# Altium PCB John_Main.PcbDoc (part 1 of 4)
Units mil, origin at the board's own origin, x right, y up, seen from the top; angles counter-clockwise.
Board outline 3346 x 2756 mil, 2 copper layers (Top Layer, Bottom Layer), stack 57 mil thick; 275 components, 161 nets, 721 pads, 395 vias.
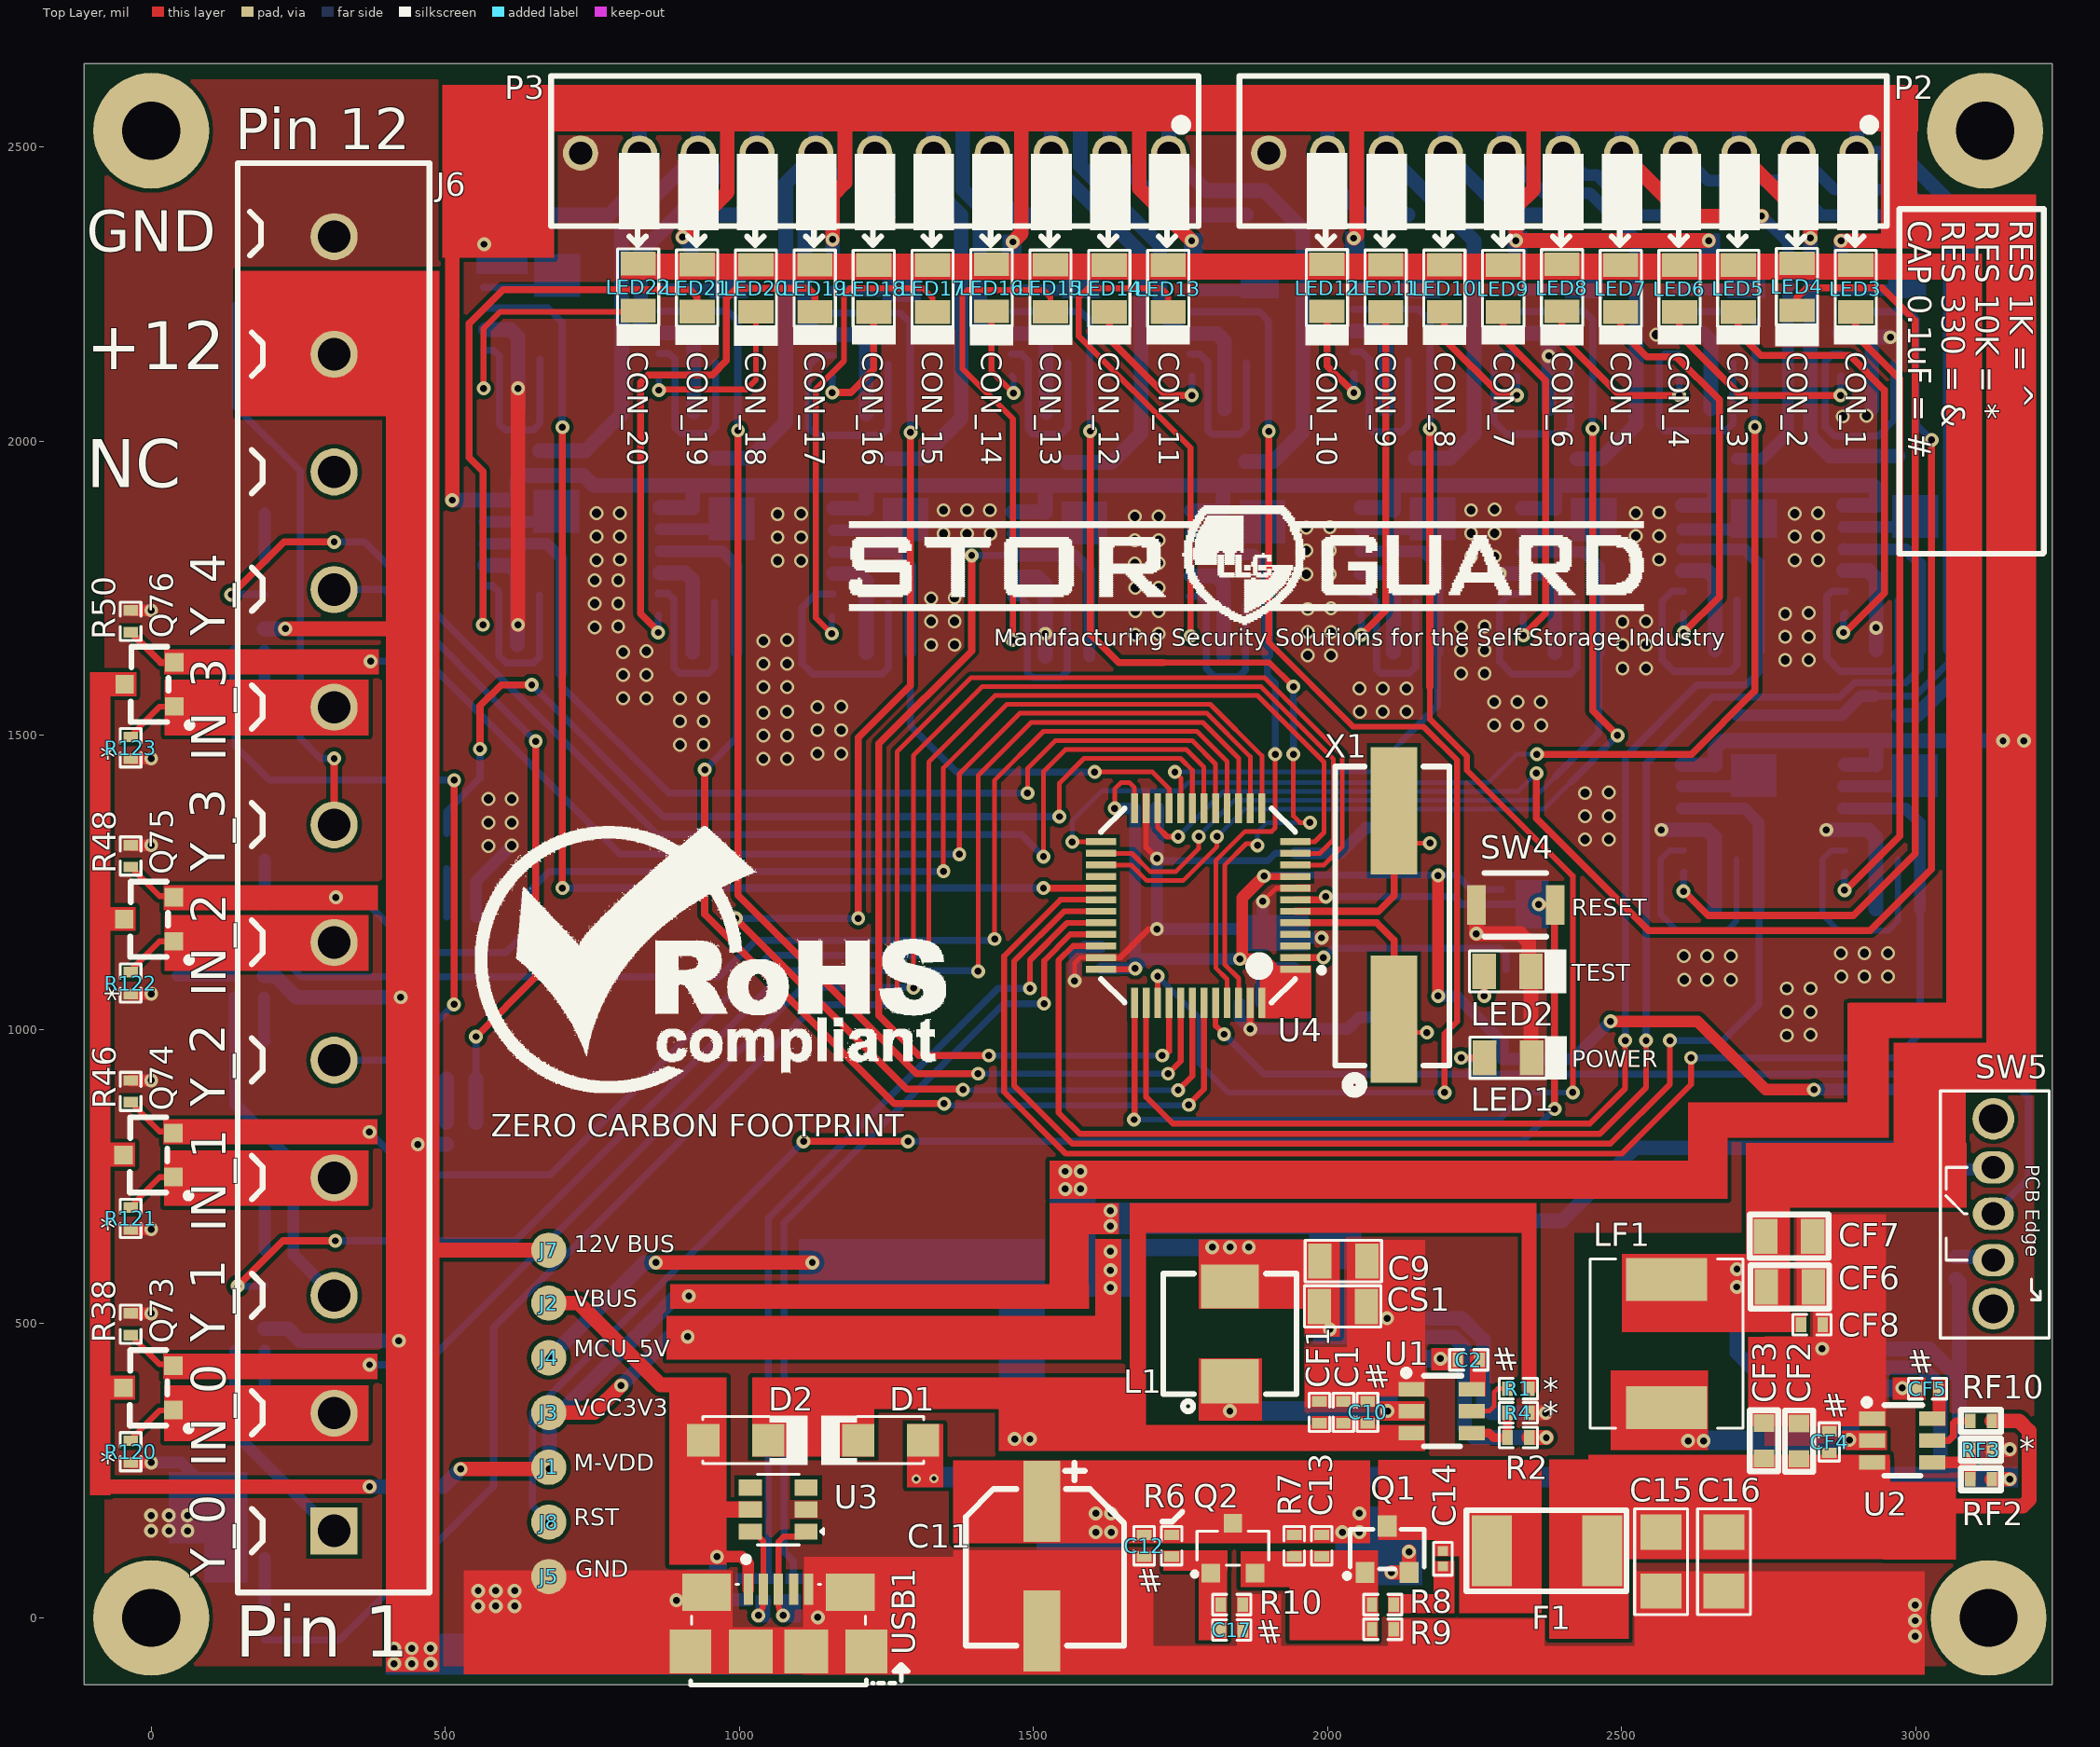
[diagram p0: Top Layer view]
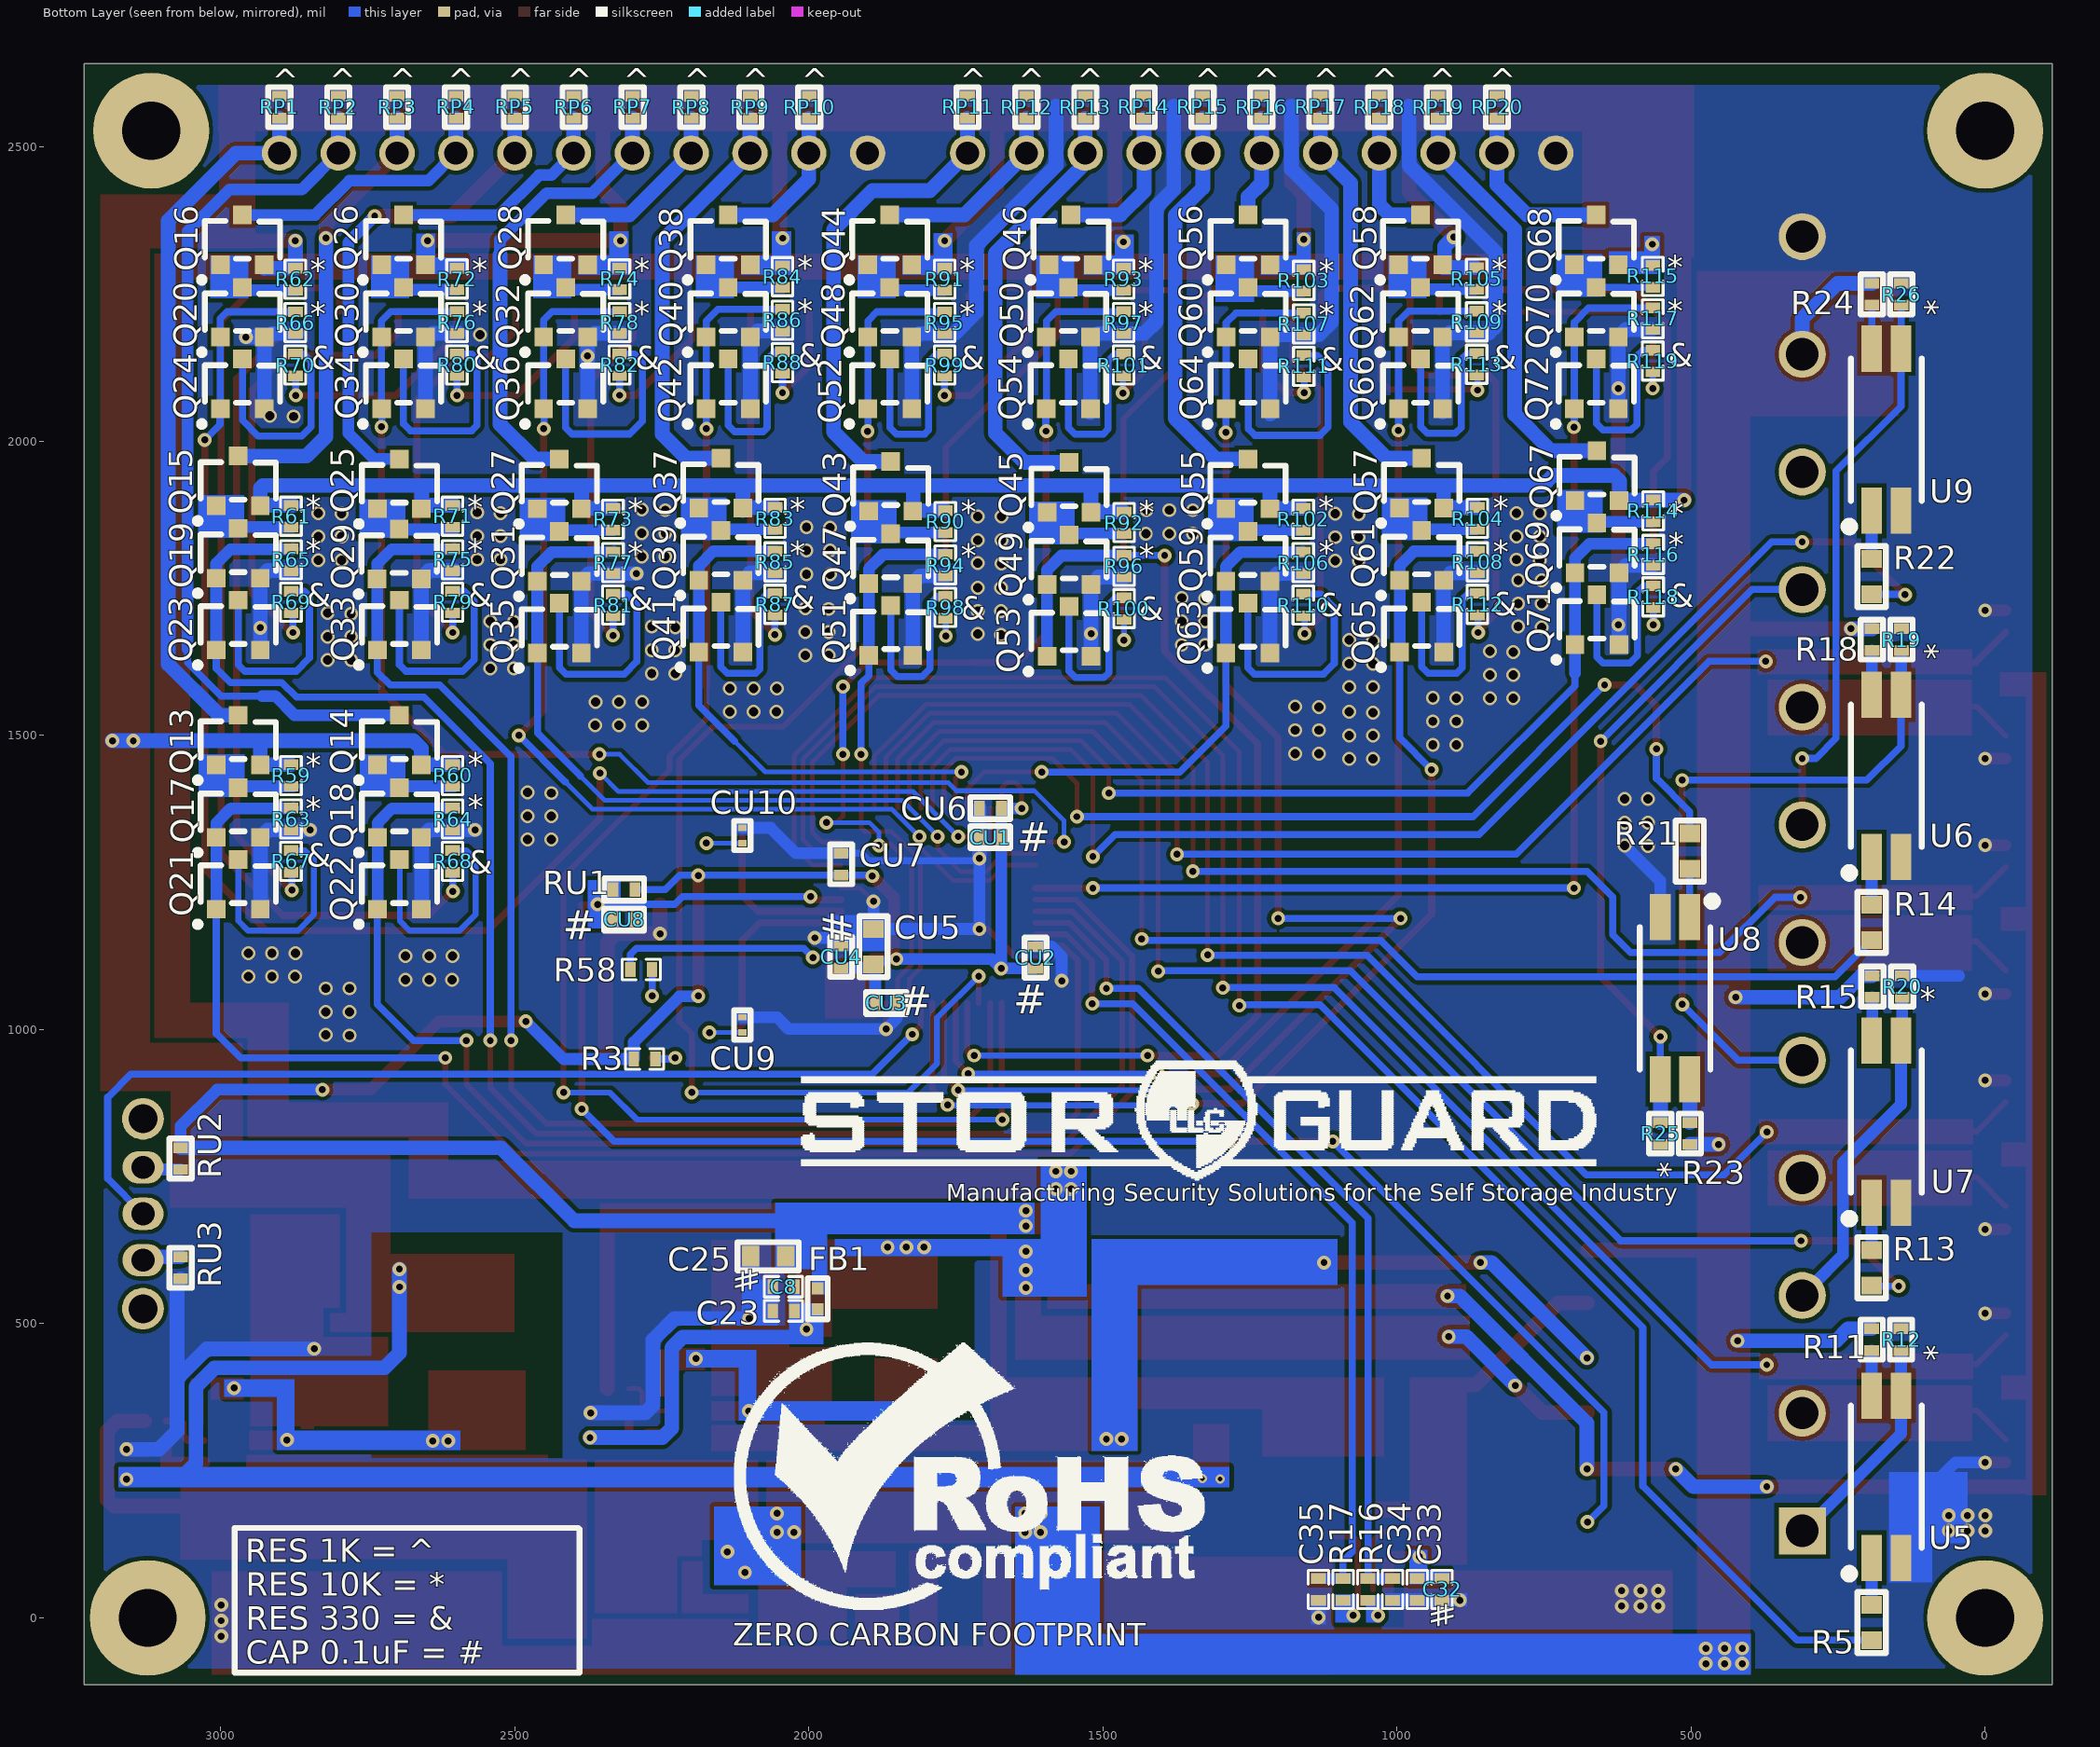
[diagram p1: Bottom Layer view, seen from below]
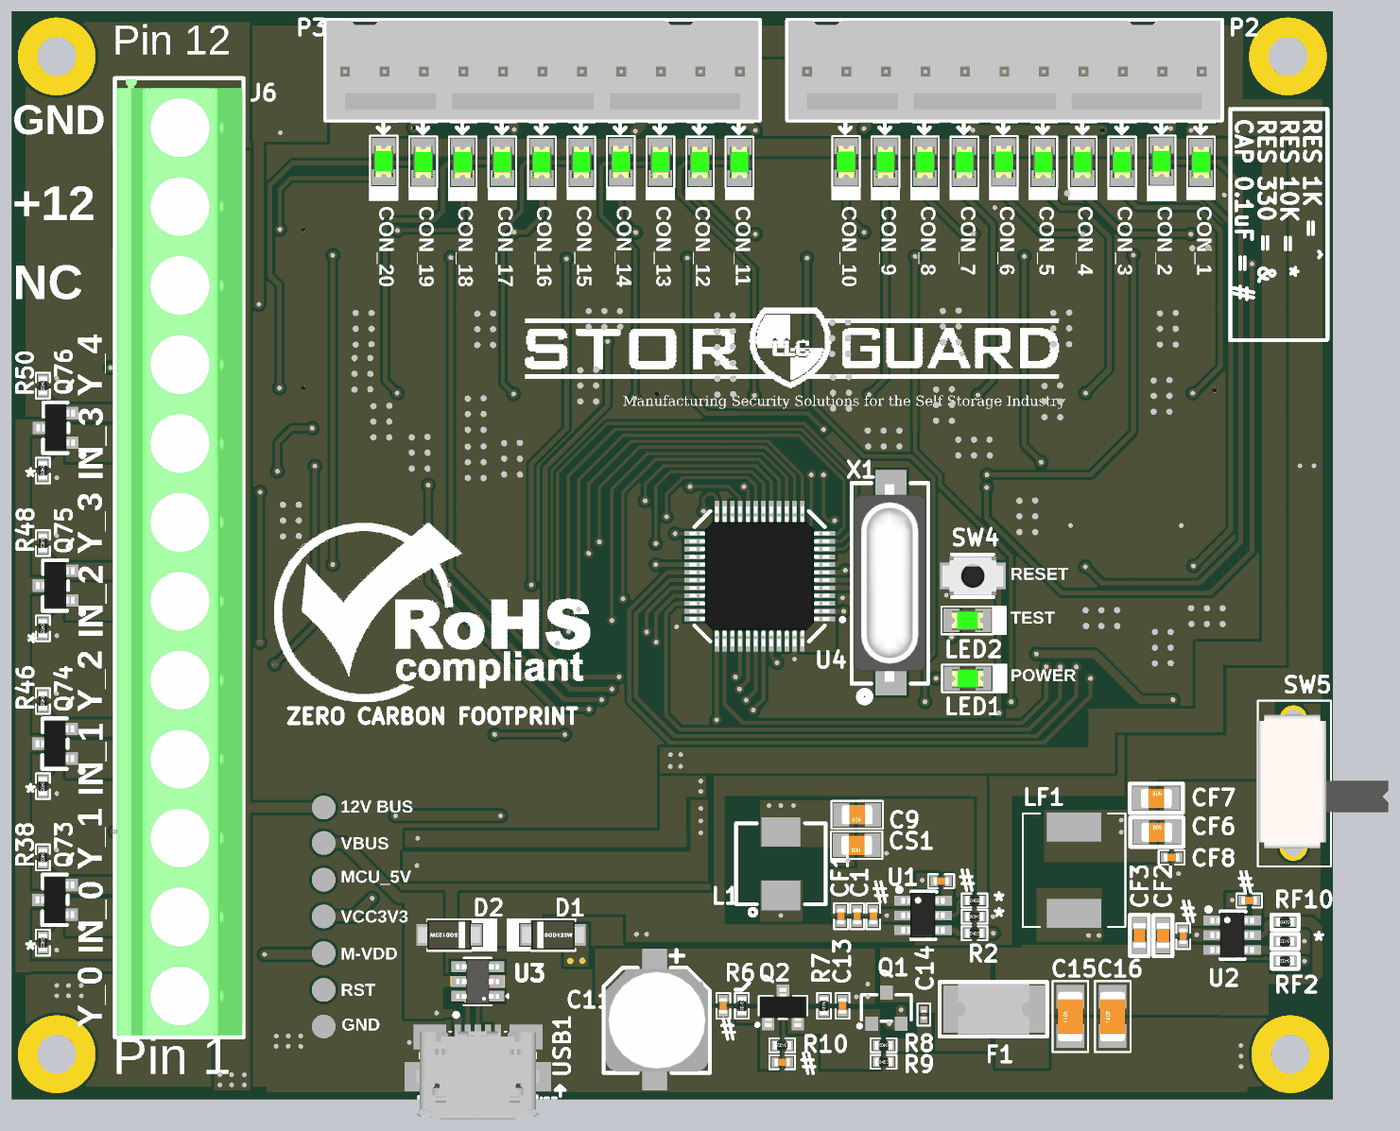
[diagram p4: 3D render of the assembled board from above, using the file's embedded part models]
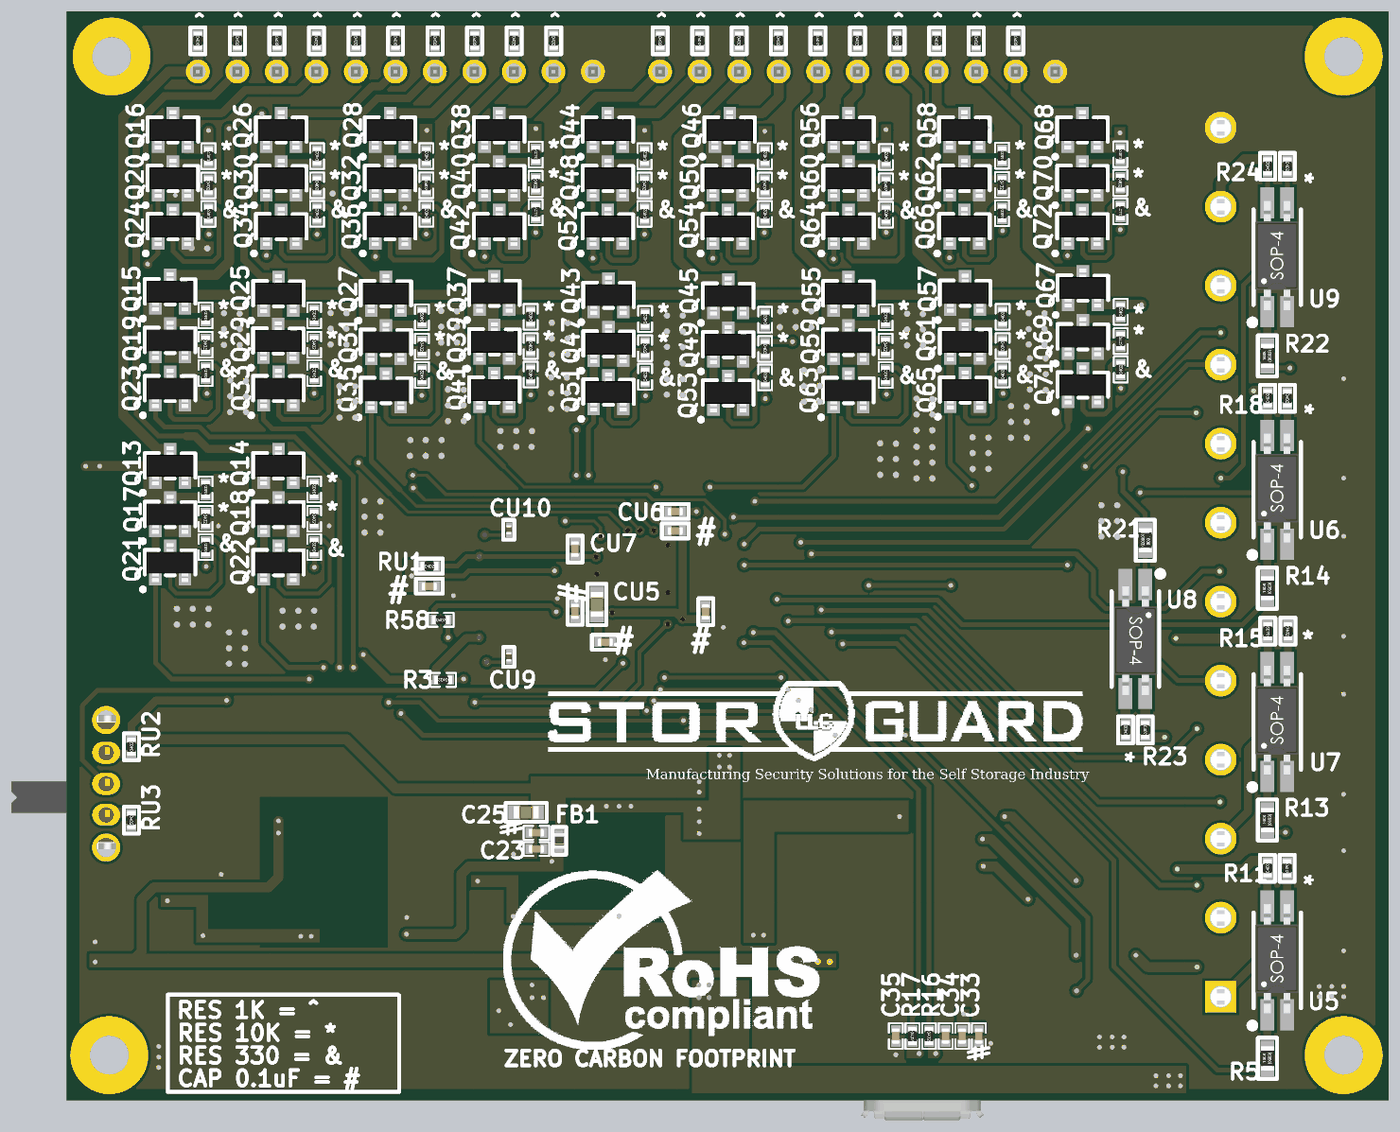
[diagram p5: 3D render of the assembled board from below, using the file's embedded part models]

## Layer stack, top to bottom
Top Solder: solder mask 2.9921, Solder Resist, Dk 3.5
Top Layer: signal copper 10
Dielectric 1: dielectric 37, FR-4, Dk 4.8
Bottom Layer: signal copper 10
Bottom Solder: solder mask 3, Solder Resist, Dk 3.5

## Board outline
-114,-114 -114,2642 3232,2642 3232,-114

## Design rules (kind name [scope] priority, off if disabled: settings)
Clearance [All] p1: gap=7 ignorepadtopadclearanceinfootprint=FALSE except(4: Arc-SMDPad Track-SMDPad SMDPad-SMDPad)
HoleToHoleClearance [All] p1: gap=2 allowstackedmicrovias=TRUE
MinimumSolderMaskSliver [All] p1: minsoldermaskwidth=0
PolygonConnect [All] p1: connectstyle=Direct reliefconductorwidth=10 reliefentries=4 polygonreliefangle="90 Angle" airgapwidth=10
RoutingVias [All] p1: holewidth=11.81 width=23.62 viastyle="Through Hole" minholewidth=7.87 minwidth=15.75 maxholewidth=15.75 maxwidth=23.62
SilkToSilkClearance [All] p1: silktosilkclearance=0
SilkToSolderMaskClearance [IsPad] p1: minsilkscreentomaskgap=0 clearancetoexposedcopper=TRUE
SolderMaskExpansion SolderMaskExpansion_1 [IsVia] p1: expansion=4 istentingtop=FALSE soldermaskfromhole=TRUE
SolderMaskExpansion [Not IsVia] p2: expansion=4 istentingtop=FALSE
Width [All] p1: maxlimit=25 minlimit=8 preferedwidth=12 minimp=50.000000 maximp=50.000000 favimp=50.000000
26 further rules are at their usual default settings.

## Classes and differential pairs
component class Controller_Section: LED3 LED4 LED5 LED6 LED7 LED8 LED9 LED10 LED11 LED12 P2 Q13 Q14 Q15 Q16 Q17 Q18 Q19 Q20 Q21 Q22 Q23 Q24 Q25 Q26 Q27 Q28 Q29 Q30 Q31 Q32 Q33 Q34 Q35 Q36 Q37 Q38 Q39 Q40 Q41 Q42 R59 R60 R61 R62 R63 R64 R65 R66 R67 R68 R69 R70 R71 R72 R73 R74 R75 R76 R77 R78 R79 R80 R81 R82 R83 R84 R85 R86 R87 R88 RP1 RP2 RP3 RP4 RP5 RP6 RP7 RP8 RP9 RP10
component class USB_Section: C32 C33 C34 C35 D1 D2 R16 R17 U3 USB1
component class "Top Sheet": J1 J2 J3 J4 J5 J7
component class Power_Section: C1 C2 C8 C9 C10 C11 C12 C13 C14 C15 C16 C17 C23 C25 CF1 CF2 CF3 CF4 CF5 CF6 CF7 CF8 CS1 F1 FB1 L1 LED1 LF1 Q1 Q2 R1 R2 R3 R4 R6 R7 R8 R9 R10 RF2 RF3 RF10 U1 U2
component class "U_Connector Section": J6 Q73 Q74 Q75 Q76 R5 R11 R12 R13 R14 R15 R18 R19 R20 R21 R22 R23 R24 R25 R26 R38 R46 R48 R50 R120 R121 R122 R123 U5 U6 U7 U8 U9
component class Controller_Section: CU1 CU2 CU3 CU4 CU5 CU6 CU7 CU8 CU9 CU10 J8 LED2 R58 RU1 RU2 RU3 SW4 SW5 U4 X1

## Components (designator, comment, footprint, x,y, rotation, side; value= is the part's Value field where it differs from the comment)
C1 "10uF" Cap0402 2026.94,349.5 r90 top
C2 "0.1uF" Cap0402 2239.94,438.5 r180 top
C8 "0.1uF" Cap0402 2042.94,562.88 r0 bottom
C9 "22uF" Cap0805 2026.94,606.5 r180 top
C10 "0.1uF" Cap0402 2067.94,349.5 r90 top
C11 "180uF" 16SVPF180M 1514.1,87.8 r270 top
C12 "0.1uF" Cap0402 1688.1,122.5 r90 top
C13 "470nF" Cap0402 1990.1,122.5 r90 top
C14 "47nF" "Cap 0201"#1 2196.1,100.5 r90 top
C15 "47uF" Cap1206 2567.1,95.5 r90 top
C16 "47uF" Cap1206 2674.1,95.5 r90 top
C17 "0.1uF" Cap0402 1837.1,-20.5 r180 top
C23 "10uF" Cap0402 2042.94,521.88 r0 bottom
C25 "4.7UF" Cap0603 2068.94,614.5 r0 bottom
C32 "0.1uF" Cap0402 923.36,48.32 r270 bottom
C33 "10uF" Cap0402 965.36,48.32 r270 bottom
C34 "47pF" Cap0402 1007.36,48.32 r270 bottom
C35 "47pF" Cap0402 1133.36,48.32 r270 bottom
CF1 "10uF" Cap0402 1985.94,349.5 r90 top
CF2 "10uF" Cap0603 2801.62,300.5 r270 top
CF3 "10uF" Cap0603 2741.94,301 r270 top
CF4 "0.1uF" Cap0402 2852.94,299 r90 top
CF5 "0.1uF" Cap0402 3019.94,389.5 r180 top
CF6 "22uF" Cap0805 2785.88,562.5 r0 top
CF7 "22uF" Cap0805 2784.94,648.5 r0 top
CF8 "0.1uF" Cap0402 2823.38,498.5 r0 top
CS1 "22uF" Cap0805 2025.94,529.5 r180 top
CU1 "0.1uF" Cap0402 1691.42,1327 r0 bottom
CU2 "0.1uF" Cap0402 1614.65,1122.42 r90 bottom
CU3 "0.1uF" Cap0402 1868.58,1045.65 r180 bottom
CU4 "0.1uF" Cap0402 1945.35,1123.6 r90 bottom
CU5 "4.7UF" Cap0603 1890,1141 r270 bottom
CU6 "1uF" Cap0402 1691.42,1376.35 r0 bottom
CU7 "10nF" Cap0402 1945.35,1281.08 r90 bottom
CU8 "0.1uF" Cap0402 2314,1187 r0 bottom
CU9 "20pF" "Cap 0201"#2 2113,1007.99 r270 bottom
CU10 "20pF" "Cap 0201"#2 2113,1330 r270 bottom
D1 "PMEG3010ER,115" SOD123W 1257.12,302 r180 top
D2 "PMEG3010ER,115" SOD123W 993.88,302 r0 top
F1 "MF-MSMF250/16X-2" MF-MSMF250/16X-2 2373.1,114 r0 top
FB1 "MMZ1005F121ET000" MMZ1005F121ET000 1984.94,542.38 r90 bottom
J1 "Socket" Socket 676,255.94 r0 top
J2 "Socket" Socket 676,535.14 r90 top
J3 "Socket" Socket 676,349 r90 top
J4 "Socket" Socket 676,442.07 r90 top
J5 "Socket" Socket 675.97,70.18 r90 top
J6 "1729225" "Terminal Block 12 Pin" 311,148 r90 top locked
J7 "Socket" Socket 676,625 r0 top
J8 "Socket" Socket 676,162.87 r0 top
L1 "MS0530-2R2M" MS0530-2R2M 1833.94,482.65 r90 top locked value=2.2uH
LED1 "LTST-C190KGKT" "LED SMT" 2307,952 r0 top
LED2 "LTST-C190KGKT" "LED SMT" 2306,1099 r0 top
LED3 "LTST-C190KGKT" "LED SMT" 2898,2259.69 r270 top
LED4 "LTST-C190KGKT" "LED SMT" 2798.11,2262.65 r270 top
LED5 "LTST-C190KGKT" "LED SMT" 2698.22,2259.65 r270 top
LED6 "LTST-C190KGKT" "LED SMT" 2598.33,2259.65 r270 top
LED7 "LTST-C190KGKT" "LED SMT" 2498.44,2259.69 r270 top
LED8 "LTST-C190KGKT" "LED SMT" 2398.56,2261 r270 top
LED9 "LTST-C190KGKT" "LED SMT" 2298.67,2259.65 r270 top
LED10 "LTST-C190KGKT" "LED SMT" 2198.78,2260.15 r270 top
LED11 "LTST-C190KGKT" "LED SMT" 2098.89,2260.15 r270 top
LED12 "LTST-C190KGKT" "LED SMT" 1999,2261 r270 top
LED13 "LTST-C190KGKT" "LED SMT" 1729,2259.65 r270 top
LED14 "LTST-C190KGKT" "LED SMT" 1628.89,2259.65 r270 top
LED15 "LTST-C190KGKT" "LED SMT" 1528.78,2260.15 r270 top
LED16 "LTST-C190KGKT" "LED SMT" 1428.67,2261 r270 top
LED17 "LTST-C190KGKT" "LED SMT" 1328.56,2259.65 r270 top
LED18 "LTST-C190KGKT" "LED SMT" 1228.44,2259.65 r270 top
LED19 "LTST-C190KGKT" "LED SMT" 1128.33,2260.15 r270 top
LED20 "LTST-C190KGKT" "LED SMT" 1028.22,2260 r270 top
LED21 "LTST-C190KGKT" "LED SMT" 928.11,2260.65 r270 top
LED22 "LTST-C190KGKT" "LED SMT" 828,2262.15 r270 top
LF1 "3.3uH" MCS0630-3R3MN2 2576.5,466.25 r90 top
P2 "0022232111" 0022232111 2400,2490 r180 top locked
P3 "0022232111" 0022232111 1230,2490 r180 top locked
Q1 "QM3001K" SOT-23 2101.1,116.5 r0 top value="P-Channel 30V Fast Switching MOSFET"
Q2 "BSS138LT1G" SOT23-3 1839.1,118.5 r0 top
Q13 "PMV65XP,215" SOT23-3 2969.99,1492 r180 bottom
Q14 "PMV65XP,215" SOT23-3 2695.99,1492 r180 bottom
Q15 "PMV65XP,215" SOT23-3 2969.99,1932.68 r180 bottom
Q16 "PMV65XP,215" SOT23-3 2962.99,2342.5 r180 bottom
Q17 "BSS138LT1G" SOT23-3 2969.99,1369 r180 bottom
Q18 "BSS138LT1G" SOT23-3 2695.99,1369 r180 bottom
Q19 "BSS138LT1G" SOT23-3 2969.99,1809.68 r180 bottom
Q20 "BSS138LT1G" SOT23-3 2962.99,2219.5 r180 bottom
Q21 "BSS138LT1G" SOT23-3 2969.99,1247 r180 bottom
Q22 "BSS138LT1G" SOT23-3 2695.99,1247 r180 bottom
Q23 "BSS138LT1G" SOT23-3 2969.99,1687.68 r180 bottom
Q24 "BSS138LT1G" SOT23-3 2962.99,2097.5 r180 bottom
Q25 "PMV65XP,215" SOT23-3 2695.99,1927.68 r180 bottom
Q26 "PMV65XP,215" SOT23-3 2689,2342.5 r180 bottom
Q27 "PMV65XP,215" SOT23-3 2423.99,1927.68 r180 bottom
Q28 "PMV65XP,215" SOT23-3 2413.36,2342.5 r180 bottom
Q29 "BSS138LT1G" SOT23-3 2696.4,1808.32 r180 bottom
Q30 "BSS138LT1G" SOT23-3 2689,2219.5 r180 bottom
Q31 "BSS138LT1G" SOT23-3 2423.99,1804.68 r180 bottom
Q32 "BSS138LT1G" SOT23-3 2413.36,2219.5 r180 bottom
Q33 "BSS138LT1G" SOT23-3 2695.99,1687.68 r180 bottom
Q34 "BSS138LT1G" SOT23-3 2689,2097.5 r180 bottom
Q35 "BSS138LT1G" SOT23-3 2423.99,1682.68 r180 bottom
Q36 "BSS138LT1G" SOT23-3 2413.36,2097.5 r180 bottom
Q37 "PMV65XP,215" SOT23-3 2149.45,1929 r180 bottom
Q38 "PMV65XP,215" SOT23-3 2137,2342.5 r180 bottom
Q39 "BSS138LT1G" SOT23-3 2149.45,1806 r180 bottom
Q40 "BSS138LT1G" SOT23-3 2137,2219.5 r180 bottom
Q41 "BSS138LT1G" SOT23-3 2149.45,1684 r180 bottom
Q42 "BSS138LT1G" SOT23-3 2137,2097.5 r180 bottom
Q43 "PMV65XP,215" SOT23-3 1860.61,1923.67 r180 bottom
Q44 "PMV65XP,215" SOT23-3 1862.19,2342.5 r180 bottom
Q45 "PMV65XP,215" SOT23-3 1557.52,1921.76 r180 bottom
Q46 "PMV65XP,215" SOT23-3 1554,2342.5 r180 bottom
Q47 "BSS138LT1G" SOT23-3 1860.61,1800.67 r180 bottom
Q48 "BSS138LT1G" SOT23-3 1862.19,2219.5 r180 bottom
Q49 "BSS138LT1G" SOT23-3 1557.52,1798.76 r180 bottom
Q50 "BSS138LT1G" SOT23-3 1558.61,2219.5 r180 bottom
Q51 "BSS138LT1G" SOT23-3 1860.61,1678.67 r180 bottom
Q52 "BSS138LT1G" SOT23-3 1862.19,2097.5 r180 bottom
Q53 "BSS138LT1G" SOT23-3 1557.52,1676.76 r180 bottom
Q54 "BSS138LT1G" SOT23-3 1558.61,2097.5 r180 bottom
Q55 "PMV65XP,215" SOT23-3 1253.43,1927.68 r180 bottom
Q56 "PMV65XP,215" SOT23-3 1252.99,2342.5 r180 bottom
Q57 "PMV65XP,215" SOT23-3 958,1929 r180 bottom
Q58 "PMV65XP,215" SOT23-3 959.76,2342.5 r180 bottom
Q59 "BSS138LT1G" SOT23-3 1253.43,1804.68 r180 bottom
Q60 "BSS138LT1G" SOT23-3 1252.99,2219.5 r180 bottom
Q61 "BSS138LT1G" SOT23-3 958,1806 r180 bottom
Q62 "BSS138LT1G" SOT23-3 959.76,2219.5 r180 bottom
Q63 "BSS138LT1G" SOT23-3 1253.43,1682.68 r180 bottom
Q64 "BSS138LT1G" SOT23-3 1252.99,2097.5 r180 bottom
Q65 "BSS138LT1G" SOT23-3 958,1684 r180 bottom
Q66 "BSS138LT1G" SOT23-3 959.76,2097.5 r180 bottom
Q67 "PMV65XP,215" SOT23-3 659.99,1941.68 r180 bottom
Q68 "PMV65XP,215" SOT23-3 661.09,2342.5 r180 bottom
Q69 "BSS138LT1G" SOT23-3 659.99,1818.68 r180 bottom
Q70 "BSS138LT1G" SOT23-3 661.09,2219.5 r180 bottom
Q71 "BSS138LT1G" SOT23-3 659.99,1696.68 r180 bottom
Q72 "BSS138LT1G" SOT23-3 661.09,2097.5 r180 bottom
Q73 "BSS138LT1G" SOT23-3 -4.5,391 r90 top locked
Q74 "BSS138LT1G" SOT23-3 -4.64,786.83 r90 top locked
Q75 "BSS138LT1G" SOT23-3 -3.63,1187.5 r90 top locked
Q76 "BSS138LT1G" SOT23-3 -2.78,1586.83 r90 top locked
R1 "10K" Res0402 2324.31,389.5 r0 top
R2 "33.2K" Res0402 2324.31,306.5 r0 top
R3 "1K" Res0402 2279,950 r0 bottom
R4 "10K" Res0402 2324.31,348.5 r180 top
R5 "390R" Res0603 193,-8 r90 bottom
R6 "330K" Res0402 1735.1,122.5 r270 top
R7 "220K" Res0402 1943.1,122.5 r270 top
R8 "100R" Res0402 2094.1,22.5 r180 top
R9 "220K" Res0402 2094.1,-19.5 r0 top
R10 "270K" Res0402 1837.1,22.5 r180 top
R11 "240R" Res0402 193,473 r90 bottom
R12 "10K" Res0402 143,473 r270 bottom
R13 "390R" Res0603 193,595.19 r90 bottom
R14 "390R" Res0603 193,1182 r90 bottom
R15 "240R" Res0402 192,1073.19 r90 bottom
R16 "27R" Res0402 1049.36,48.32 r270 bottom
R17 "27R" Res0402 1091.36,48.32 r270 bottom
R18 "240R" Res0402 192.38,1663 r90 bottom
R19 "10K" Res0402 142.38,1663 r270 bottom
R20 "10K" Res0402 141,1073.19 r270 bottom
R21 "390R" Res0603 502.12,1303.29 r270 bottom
R22 "390R" Res0603 193,1770.02 r90 bottom
R23 "240R" Res0402 502.12,823.29 r270 bottom
R24 "240R" Res0402 192.52,2250.02 r90 bottom
R25 "10K" Res0402 552.12,823.29 r90 bottom
R26 "10K" Res0402 142.52,2250.02 r270 bottom
R38 "4.7K" Res0402 -35,499 r270 top
R46 "4.7K" Res0402 -35,895 r270 top
R48 "4.7K" Res0402 -35,1295 r270 top
R50 "4.7K" Res0402 -35,1694 r270 top
R58 "1K" Res0402 2285,1102 r180 bottom
R59 "10K" Res0402 2880.32,1432 r90 bottom
R60 "10K" Res0402 2605.58,1432 r90 bottom
R61 "10K" Res0402 2880.32,1872.68 r90 bottom
R62 "10K" Res0402 2872.95,2275.68 r90 bottom
R63 "10K" Res0402 2880.32,1358 r270 bottom
R64 "10K" Res0402 2605.58,1358 r270 bottom
R65 "10K" Res0402 2880.32,1798.68 r270 bottom
R66 "10K" Res0402 2872.95,2201.68 r270 bottom
R67 "330R" Res0402 2880.32,1286 r90 bottom
R68 "330R" Res0402 2605.58,1286 r90 bottom
R69 "330R" Res0402 2880.32,1726.68 r90 bottom
R70 "330R" Res0402 2872.95,2129.68 r90 bottom
R71 "10K" Res0402 2605.58,1872.68 r90 bottom
R72 "10K" Res0402 2598.21,2276 r90 bottom
R73 "10K" Res0402 2332.83,1867.68 r90 bottom
R74 "10K" Res0402 2321.82,2276 r90 bottom
R75 "10K" Res0402 2605.58,1798.68 r270 bottom
R76 "10K" Res0402 2598.21,2202 r270 bottom
R77 "10K" Res0402 2332.83,1793.68 r270 bottom
R78 "10K" Res0402 2321.82,2202 r270 bottom
R79 "330R" Res0402 2605.58,1726.68 r90 bottom
R80 "330R" Res0402 2598.21,2130 r90 bottom
R81 "330R" Res0402 2332.83,1721.68 r90 bottom
R82 "330R" Res0402 2321.82,2130 r90 bottom
R83 "10K" Res0402 2057.55,1869 r90 bottom
R84 "10K" Res0402 2044.72,2280 r90 bottom
R85 "10K" Res0402 2057.55,1795 r270 bottom
R86 "10K" Res0402 2044.72,2206 r270 bottom
R87 "330R" Res0402 2057.55,1723 r90 bottom
R88 "330R" Res0402 2044.72,2134 r90 bottom
R90 "10K" Res0402 1767.96,1863.67 r90 bottom
R91 "10K" Res0402 1769.17,2275.67 r90 bottom
R92 "10K" Res0402 1464.12,1861.76 r90 bottom
R93 "10K" Res0402 1464.84,2275.76 r90 bottom
R94 "10K" Res0402 1767.96,1789.67 r270 bottom
R95 "10K" Res0402 1769.17,2201.67 r270 bottom
R96 "10K" Res0402 1464.12,1787.76 r270 bottom
R97 "10K" Res0402 1464.84,2201.76 r270 bottom
R98 "330R" Res0402 1767.96,1717.67 r90 bottom
R99 "330R" Res0402 1769.17,2129.67 r90 bottom
R100 "330R" Res0402 1464.12,1715.76 r90 bottom
R101 "330R" Res0402 1464.84,2129.76 r90 bottom
R102 "10K" Res0402 1159.29,1867.68 r90 bottom
R103 "10K" Res0402 1158.48,2273.68 r90 bottom
R104 "10K" Res0402 863.12,1869 r90 bottom
R105 "10K" Res0402 864.5,2277 r90 bottom
R106 "10K" Res0402 1159.29,1793.68 r270 bottom
R107 "10K" Res0402 1158.48,2199.68 r270 bottom
R108 "10K" Res0402 863.12,1795 r270 bottom
R109 "10K" Res0402 864.5,2203 r270 bottom
R110 "330R" Res0402 1159.29,1721.68 r90 bottom
R111 "330R" Res0402 1158.48,2127.68 r90 bottom
R112 "330R" Res0402 863.12,1723 r90 bottom
R113 "330R" Res0402 864.5,2131 r90 bottom
R114 "10K" Res0402 564.37,1881.68 r90 bottom
R115 "10K" Res0402 565.09,2280.5 r90 bottom
R116 "10K" Res0402 564.37,1807.68 r270 bottom
R117 "10K" Res0402 565.09,2208.5 r270 bottom
R118 "330R" Res0402 564.37,1735.68 r90 bottom
R119 "330R" Res0402 565.09,2136.5 r90 bottom
R120 "10K" Res0402 -35,282.5 r270 top
R121 "10K" Res0402 -35,679 r270 top
R122 "10K" Res0402 -35,1079 r270 top
R123 "10K" Res0402 -35,1479 r270 top
RF2 "54.9K" Res0402 3110.95,235.68 r180 top
RF3 "10K" Res0402 3110.95,285.68 r180 top
RF10 "20K" Res0402 3110.95,334.68 r0 top
RP1 "1K" Res0402 2900,2568 r270 bottom
RP2 "1K" Res0402 2799.92,2568 r270 bottom
RP3 "1K" Res0402 2699.85,2568 r270 bottom
RP4 "1K" Res0402 2599.77,2568 r270 bottom
RP5 "1K" Res0402 2499.7,2568 r270 bottom
RP6 "1K" Res0402 2399.62,2568 r270 bottom
RP7 "1K" Res0402 2299.54,2568 r270 bottom
RP8 "1K" Res0402 2199.47,2568 r270 bottom
RP9 "1K" Res0402 2099.39,2568 r270 bottom
RP10 "1K" Res0402 1999.31,2568 r270 bottom
RP11 "1K" Res0402 1730,2568 r270 bottom
RP12 "1K" Res0402 1629.89,2568 r270 bottom
RP13 "1K" Res0402 1529.78,2568 r270 bottom
RP14 "1K" Res0402 1430.67,2568 r270 bottom
RP15 "1K" Res0402 1330.56,2568 r270 bottom
RP16 "1K" Res0402 1230.44,2568 r270 bottom
RP17 "1K" Res0402 1130.33,2568 r270 bottom
RP18 "1K" Res0402 1030.22,2568 r270 bottom
RP19 "1K" Res0402 930.11,2568 r270 bottom
RP20 "1K" Res0402 830,2568 r270 bottom
RU1 "20K" Res0402 2314,1238 r180 bottom
RU2 "20K" Res0402 3068,780.71 r90 bottom
RU3 "20K" Res0402 3068,595 r270 bottom
SW4 "B3U-1000P" B3U-1000P 2320,1212 r0 top
SW5 "OS102011MA1QN1" OS102011MA1QN1 3132,765.66 r270 top
U1 "TPS563201DDCR" TPS563201DDCR 2193.79,351.5 r0 top locked
U2 "TPS563201DDCR" TPS563201DDCR 2976.94,301.5 r0 top
U3 "NUP2114UCMR6T1G" 6-TSOP 1066,184 r180 top value=1pF
U4 "STM32F070CBT6TR" STM32F070CBT6TR 1780,1211 r180 top locked
U5 "PS2801C-1-F3-A" PS2801C-1-F3-A 193,102 r90 bottom locked
U6 "PS2801C-1-F3-A" PS2801C-1-F3-A 193,1293.41 r90 bottom
U7 "PS2801C-1-F3-A" PS2801C-1-F3-A 193,705.6 r90 bottom
U8 "PS2801C-1-F3-A" PS2801C-1-F3-A 502.12,1191.29 r270 bottom
U9 "PS2801C-1-F3-A" PS2801C-1-F3-A 193,1882.02 r90 bottom
USB1 "10118192-0001LF" "Micro Usb Conn SMD" 1066.44,-4.34 r180 top
X1 "49MD-8.000-20-20-20/A" 49MD-8.000-20-20-20/A 2113,1195 r90 top locked value=8MHz

## Footprints (in the part's own frame and the unit in brackets; to place one, negate y for a bottom-side part, rotate by r counter-clockwise, add the part's x,y. Pads: shape width x height; smd on the part's side, far side on the other; paste and mask are expansions set on the pad)
6-TSOP [mm]
  rect 1x0.7 smd paste+0 mask+0.051: 1(-1.2,0.95) 2(-1.2,0) 3(-1.2,-0.95) 4(1.2,-0.95) 5(1.2,0) 6(1.2,0.95)
  silkscreen extent -1.96,-1.52 0.9,1.52, body extent -1.38,-1.45 1.38,1.45, height 1.1
16SVPF180M [mm]
  rect 3.5x1.6 smd: 1(-2.8,0) 2(2.8,0)
  silkscreen extent -4.47,-3.28 3.43,3.56, body extent -3.26,-3.15 3.34,3.45, height 6
49MD-8.000-20-20-20/A [mm]
  rect 5.5x2 smd: 1(-4.5,0) 2(4.5,0)
  silkscreen extent -7.65,-2.39 6.4,2.54, body extent -6.38,-2.26 6.32,2.44, height 4.2
0022232111 [mil]
  round 60 hole 39.37: 1(-500,0) 2(-400,0) 3(-300,0) 4(-200,0) 5(-100,0) 6(0,0) 7(100,0) 8(200,0) 9(300,0) 10(400,0) 11(500,0)
  silkscreen extent -551,-131 550,124, body extent -547,-128 547,122, height 436
B3U-1000P [mm] "SWITCH TACTILE SPST-NO 0.05A 12V"
  rect 0.82x1.72 smd: 1(-1.7,0) 2(1.7,0)
  silkscreen extent -1.35,-1.37 1.32,1.37, body extent -2,-1.26 2,1.24, height 1.6
Cap0402 [mil]
  rect 18x25 smd: 1(-18.5,0) 2(18.5,0)
  silkscreen extent -32,-18 32,18, body extent -20,-10 20,10, height 19
Cap0603 [mil]
  rect 30x35 smd: 1(30,0) 2(-30,0)
  silkscreen extent -52,-24 52,24, body extent -31,-16 32,16, height 34
Cap0805 [mil] "SMD 0805"
  rect 40x60 smd: 1(-40,0) 2(40,0)
  silkscreen extent -65,-35 65,35, body extent -39,-25 39,25, height 30
Cap1206 [mil] "SMD 1206"
  rect 60x70 smd: 1(-50,0) 2(50,0)
  silkscreen extent -90,-45 90,45, body extent -63,-31 63,32, height 39
"Cap 0201"#1 [mm]
  rect 0.42x0.46 smd: 1(-0.33,0) 2(0.33,0)
  silkscreen extent -0.71,-0.41 0.71,0.41, body extent -0.3,-0.16 0.3,0.17, height 0.28
"Cap 0201"#2 [mm]
  rect 0.27x0.37 smd: 1(-0.33,0) 2(0.33,0)
  silkscreen extent -0.64,-0.36 0.64,0.36, body extent -0.3,-0.16 0.3,0.17, height 0.21
"LED SMT" [mil] "SMD 0805"
  rect 40x60 smd: 1(-40,0) 2(40,0)
  silkscreen extent -65,-37 100,37, body extent -40,-25 40,25, height 43
MCS0630-3R3MN2 [mm]
  rect 1.85x3.5 smd: 1(-2.775,0) 2(2.775,0)
  silkscreen extent -3.65,-3.3 3.65,3.3
MF-MSMF250/16X-2 [mm] "PTC RESET FUSE 16V 2.5A 1812"
  rect 1.73x3.05 smd: 1(-2.39,0) 2(2.39,0)
  silkscreen extent -3.48,-1.75 3.43,1.75, body extent -2.3,-1.62 2.3,1.62, height 1.15
"Micro Usb Conn SMD" [mm] "CONN RCPT USB2.0 MICRO B SMD R/A"
  rect 0.4x1.35 smd: 1(1.3,-1.338) 2(0.65,-1.338) 3(0,-1.338) 4(-0.65,-1.338) 5(-1.3,-1.338)
  rect 2.1x1.6 smd: MP1(3.1,-1.212) MP2(-3.1,-1.212)
  rect 1.8x1.9 smd: MP3(-3.8,1.338) MP6(3.8,1.338)
  rect 1.9x1.9 smd: MP4(-1.2,1.338) MP5(1.2,1.338)
  silkscreen extent -5.61,-2.74 3.8,2.79, body extent -3.95,-1.57 3.96,4.09, height 2.74
MMZ1005F121ET000 [mm]
  rect 0.52x0.52 smd: 1(-0.45,0) 2(0.45,0)
  silkscreen extent -0.88,-0.43 0.9,0.43, body extent -0.5,-0.3 0.5,0.3, height 0.5
MS0530-2R2M [mm]
  rect 1.895x2.5 smd: 1(-2.047,0) 2(2.048,0)
  silkscreen extent -3.34,-2.88 2.6,2.88
OS102011MA1QN1 [mm] "2 Position SPDT Miniature Slide Switch 100MA 12V Through Hole, Right Angle"
  oval 1.4x1.778 hole 1: 1(0,0) 2(2,0) 3(4,0)
  round 1.8 hole 1.25: MH1(-2.1,0) MH2(6.1,0)
  silkscreen extent -3.3,-2.29 7.37,2.41, body extent -2.4,-2.29 6.21,6.09, height 4.71
PS2801C-1-F3-A [mm]
  rect 2x0.9 smd: 1(0,0) 2(0,-1.27) 3(7,-1.27) 4(7,0)
  silkscreen extent -0.87,-2.16 6.58,1.14, body extent 0.11,-2.02 7.11,0.78, height 2.1
Res0402 [mil]
  rect 18x25 smd: 1(-18.5,0) 2(18.5,0)
  silkscreen extent -32,-18 32,18, body extent -23,-11 23,11, height 16
Res0603 [mil]
  rect 30x35 smd: 1(30,0) 2(-30,0)
  silkscreen extent -52,-24 52,24, body extent -31,-17 31,17, height 18
Socket [mil]
  round 60 smd: 1(0,0)
SOD123W [mm] "DIODE SCHOTTKY 30V 1A SOD123W"
  rect 1.4x1.4 smd: A(-1.4,0) K(1.4,0)
  silkscreen extent -1.42,-1.07 3,1.07, body extent -2,-0.95 2,0.95, height 1.1
SOT23-3 [mm] "SOT23, 3-Leads, Body 2.9x1.3mm, Pitch 0.95mm, Lead Span 2.3mm - Reverse Pinning, IPC High Density"
  rect 0.8x0.8 smd: 1(-0.95,-1.075) 2(0.95,-1.075) 3(0,1.075)
  silkscreen extent -1.73,-1.19 1.55,0.74, body extent -1.5,-1.25 1.5,1.25, height 1.05
SOT-23 [mm] "TRANS NPN 40V 0.6A SOT23"
  rect 0.82x0.92 smd: 1(-0.95,-1) 2(0.95,-1) 3(0,1)
  silkscreen extent -1.82,-1.23 1.6,0.86, body extent -1.6,-0.71 1.63,0.84, height 0.25
STM32F070CBT6TR [mm]
  rect 1.3x0.3 smd: 1(-4.2,2.75) 2(-4.2,2.25) 3(-4.2,1.75) 4(-4.2,1.25) 5(-4.2,0.75) 6(-4.2,0.25) 7(-4.2,-0.25) 8(-4.2,-0.75) 9(-4.2,-1.25) 10(-4.2,-1.75) 11(-4.2,-2.25) 12(-4.2,-2.75) 25(4.2,-2.75) 26(4.2,-2.25) 27(4.2,-1.75) 28(4.2,-1.25) 29(4.2,-0.75) 30(4.2,-0.25) 31(4.2,0.25) 32(4.2,0.75) 33(4.2,1.25) 34(4.2,1.75) 35(4.2,2.25) 36(4.2,2.75)
  rect 0.3x1.3 smd: 13(-2.75,-4.2) 14(-2.25,-4.2) 15(-1.75,-4.2) 16(-1.25,-4.2) 17(-0.75,-4.2) 18(-0.25,-4.2) 19(0.25,-4.2) 20(0.75,-4.2) 21(1.25,-4.2) 22(1.75,-4.2) 23(2.25,-4.2) 24(2.75,-4.2) 37(2.75,4.2) 38(2.25,4.2) 39(1.75,4.2) 40(1.25,4.2) 41(0.75,4.2) 42(0.25,4.2) 43(-0.25,4.2) 44(-0.75,4.2) 45(-1.25,4.2) 46(-1.75,4.2) 47(-2.25,4.2) 48(-2.75,4.2)
  silkscreen extent -5.44,-4.19 4.19,4.19, body extent -4.5,-4.5 4.5,4.5, height 1.39
"Terminal Block 12 Pin" [mil] "TERM BLK 12P SIDE ENT 5.08MM PCB"
  rect 80x80 hole 55: 1(0,0)
  round 80 hole 55: 2(200,0) 3(400,0) 4(600,0) 5(800,0) 6(1000,0) 7(1200,0) 8(1400,0) 9(1600,0) 10(1800,0) 11(2000,0) 12(2200,0)
  silkscreen extent -105,-162 2325,164, body extent -100,-159 2322,159, height 413
TPS563201DDCR [mm]
  rect 1.12x0.62 smd: 1(-1.3,0.95) 2(-1.3,0) 3(-1.3,-0.95) 4(1.3,-0.95) 5(1.3,0) 6(1.3,0.95)
  silkscreen extent -1.67,-1.52 0.86,1.79, body extent -1.4,-1.45 1.4,1.45, height 1.44

## Part data
C1 C23 C33 CF1: library part CL05A106MP8NUB8, "CAP CER 10UF 10V X5R 0402", Case/Package=0402, Case Code (Metric)=1005, MANUFACTURER=Samsung, Max Operating Temperature=85°C, Min Operating Temperature=-55°C, Supplier Part Number 1=1276-6830-1-ND, Tolerance=20%, Voltage Rating=10V, Capacitance=10uF, Case Code (Imperial)=0402, Length=0.039inch, Manufacturer Part Number=CL05A106MP8NUB8, Mount="Surface Mount", Packaging="Tape and Reel", Pricing 1="1=0.45, 10=0.311, 100=0.1863, 500=0.13972, 1000=0.11799, 2500=0.11178 (USD)", Stock 1=1158256, Supplier 1=Digi-Key, Thickness=0.035inch, Width=0.02inch
C2 C8 C10 C12 C17 C32 CF4 CF5 CF8: library part CC0402KRX5R7BB104, "CAP CER 0.1UF 16V X5R 0402", Capacitance=100nF, Case/Package=0402, Case Code (Metric)=1005, Dielectric=X5R, MANUFACTURER=Yageo, Max Operating Temperature=85°C, Min Operating Temperature=-55°C, Package Quantity=1, Supplier Part Number 1=311-1347-1-ND, Tolerance=10%, Voltage Rating=16V, Case Code (Imperial)=0402, ComponentLink1Description=http://www.yageo.com/documents/recent/UPY-GPHC_X5R_4V-to-50V_12.pdf?src-supplier=Avnet, ComponentLink1URL=http://www.yageo.com/documents/recent/UPY-GPHC_X5R_4V-to-50V_12.pdf?src-supplier=Avnet, ComponentLink2Description=http://www.yageo.com/documents/recent/UPY-GPHC_X5R_4V-to-50V_25.pdf?src-supplier=Digi-Key, ComponentLink2URL=http://www.yageo.com/documents/recent/UPY-GPHC_X5R_4V-to-50V_25.pdf?src-supplier=Digi-Key, ComponentLink3Description=http://www.yageo.com/exep/pages/download/literatures/ProductSelectionGuide%202014_Final_2.pdf?src-supplier=Digi-Key, ComponentLink3URL=http://www.yageo.com/exep/pages/download/literatures/ProductSelectionGuide%202014_Final_2.pdf?src-supplier=Digi-Key, ComponentLink4Description=http://www.yageo.com/documents/recent/UPY-GPHC_X5R_4V-to-50V_12.pdf?src-supplier=Avnet+Europe, ComponentLink4URL=http://www.yageo.com/documents/recent/UPY-GPHC_X5R_4V-to-50V_12.pdf?src-supplier=Avnet+Europe, Composition=Ceramic, Depth=0.5mm, Halogen Free="Halogen Free", Height=0.5mm, Lead Free="Lead Free", Length=1mm, Manufacturer Part Number=CC0402KRX5R7BB104, Mount="Surface Mount", Number of Pins=2, Packaging="Tape and Reel", Pricing 1="1=0.1, 10=0.03, 100=0.0135, 500=0.0096, 1000=0.0076, 2500=0.0069, 5000=0.0063 (USD)", Radiation Hardening=No, REACH SVHC=Unknown, Stock 1=2577166, Supplier 1=Digi-Key, Termination=SMD/SMT, Thickness=0.022inch, Voltage Rating (DC)=16V, Width=0.02inch
C9 CS1: library part GRM21BR61E226ME44K, "CAP CER 22UF 25V X5R 0805", Case/Package=0805, Case Code (Metric)=2012, Dielectric=X5R, MANUFACTURER=Murata, Max Operating Temperature=85°C, Min Operating Temperature=-55°C, Package Quantity=10000, Supplier Part Number 1=GRM21BR61E226ME44K-CUTT, Tolerance=20%, Voltage Rating=25V, Capacitance=22uF, Case Code (Imperial)=0805, Composition=Ceramic, Height=1.25mm, Length=0.079inch, Manufacturer Part Number=GRM21BR61E226ME44K, Mount="Surface Mount", Packaging="Tape and Reel", Pricing 1="1=0.137, 500=0.129, 1500=0.128, 2500=0.127 (USD)", Stock 1=8384, Supplier 1="Future Electronics", Termination=SMD/SMT, Thickness=0.057inch, Voltage Rating (DC)=25V, Weight=0.000335oz, Width=1.25mm
C11: library part 16SVPF180M, "CAP ALUM POLY 180UF 20% 16V SMD", Case/Package=Radial, ESR (Equivalent Series Resistance)=22mR, Leakage Current=576uA, MANUFACTURER=Panasonic, Max Operating Temperature=105°C, Min Operating Temperature=-55°C, Package Quantity=1000, Ripple Current=3.3A, Supplier Part Number 1=P16479DKR-ND, Tolerance=20%, Voltage=16V, Capacitance=180uF, ComponentLink1Description=http://www.mouser.com/ds/2/315/AAB8000C177-947360.pdf?src-supplier=Mouser, ComponentLink1URL=http://www.mouser.com/ds/2/315/AAB8000C177-947360.pdf?src-supplier=Mouser, ComponentLink2Description=http://www.farnell.com/datasheets/1734360.pdf?src-supplier=Element14, ComponentLink2URL=http://www.farnell.com/datasheets/1734360.pdf?src-supplier=Element14, ComponentLink3Description=https://www.distrelec.biz/Web/Downloads/g_/ds/svpf_eng_ds.pdf?mime=application%2Fpdf&src-supplier=Distrelec, ComponentLink3URL=https://www.distrelec.biz/Web/Downloads/g_/ds/svpf_eng_ds.pdf?mime=application%2Fpdf&src-supplier=Distrelec, ComponentLink4Description=http://www.farnell.com/datasheets/2059634.pdf?src-supplier=Farnell, ComponentLink4URL=http://www.farnell.com/datasheets/2059634.pdf?src-supplier=Farnell, Diameter=6.3mm, Dissipation Factor=12%, Height=5.9mm, Height - Seated (Max)=0.236inch, Lead Free="Lead Free", Length=5.9mm, Life (Hours)=5000Hour, Manufacturer Part Number=16SVPF180M, Mount="Surface Mount", Number of Pins=6, Packaging="Tape and Reel", Polarity=Polar, Pricing 1="1=1.29, 10=1.022, 100=0.7662, 500=0.57888 (USD)", Radiation Hardening=No, REACH SVHC="No SVHC", Ripple Current (AC)=3.3A, Stock 1=50, Supplier 1=Digi-Key, Termination=SMD/SMT, Voltage Rating=16V, Voltage Rating (DC)=16V
C13: library part GRT155R61E474KE01D, "CAP CER 0.47UF 25V X5R 0402", Case/Package=0402, Case Code (Metric)=1005, MANUFACTURER=Murata, Max Operating Temperature=85°C, Min Operating Temperature=-55°C, Ratings=AEC-Q200, Supplier Part Number 1=490-12269-1-ND, Tolerance=10%, Voltage Rating=25V, Capacitance=470nF, Case Code (Imperial)=0402, ComponentLink1Description=http://www.yageo.com/documents/recent/UPY-GPHC_X5R_4V-to-50V_12.pdf?src-supplier=Avnet, ComponentLink1URL=http://www.yageo.com/documents/recent/UPY-GPHC_X5R_4V-to-50V_12.pdf?src-supplier=Avnet, ComponentLink2Description=http://www.yageo.com/documents/recent/UPY-GPHC_X5R_4V-to-50V_25.pdf?src-supplier=Digi-Key, ComponentLink2URL=http://www.yageo.com/documents/recent/UPY-GPHC_X5R_4V-to-50V_25.pdf?src-supplier=Digi-Key, ComponentLink3Description=http://www.yageo.com/exep/pages/download/literatures/ProductSelectionGuide%202014_Final_2.pdf?src-supplier=Digi-Key, ComponentLink3URL=http://www.yageo.com/exep/pages/download/literatures/ProductSelectionGuide%202014_Final_2.pdf?src-supplier=Digi-Key, ComponentLink4Description=http://www.yageo.com/documents/recent/UPY-GPHC_X5R_4V-to-50V_12.pdf?src-supplier=Avnet+Europe, ComponentLink4URL=http://www.yageo.com/documents/recent/UPY-GPHC_X5R_4V-to-50V_12.pdf?src-supplier=Avnet+Europe, Length=0.039inch, Manufacturer Part Number=GRT155R61E474KE01D, Mount="Surface Mount", Packaging="Tape and Reel", Pricing 1="1=0.13, 10=0.091, 100=0.043, 500=0.0302, 1000=0.025, 2500=0.0232, 5000=0.0213 (USD)", Stock 1=1021792, Supplier 1=Digi-Key, Thickness=0.022inch, Width=0.02inch
C14: library part GRM033R61C473KE84D, "CAP CER 0.047UF 16V X5R 0201", Case/Package=0201, Case Code (Metric)=0603, Dielectric=X5R, MANUFACTURER=Murata, Max Operating Temperature=85°C, Min Operating Temperature=-55°C, Package Quantity=15000, Supplier Part Number 1=490-7227-1-ND, Tolerance=10%, Voltage Rating=16V, Capacitance=47nF, Case Code (Imperial)=0201, ComponentLink1Description=http://www.yageo.com/documents/recent/UPY-GPHC_X5R_4V-to-50V_12.pdf?src-supplier=Avnet, ComponentLink1URL=http://www.yageo.com/documents/recent/UPY-GPHC_X5R_4V-to-50V_12.pdf?src-supplier=Avnet, ComponentLink2Description=http://www.yageo.com/documents/recent/UPY-GPHC_X5R_4V-to-50V_25.pdf?src-supplier=Digi-Key, ComponentLink2URL=http://www.yageo.com/documents/recent/UPY-GPHC_X5R_4V-to-50V_25.pdf?src-supplier=Digi-Key, ComponentLink3Description=http://www.yageo.com/exep/pages/download/literatures/ProductSelectionGuide%202014_Final_2.pdf?src-supplier=Digi-Key, ComponentLink3URL=http://www.yageo.com/exep/pages/download/literatures/ProductSelectionGuide%202014_Final_2.pdf?src-supplier=Digi-Key, ComponentLink4Description=http://www.yageo.com/documents/recent/UPY-GPHC_X5R_4V-to-50V_12.pdf?src-supplier=Avnet+Europe, ComponentLink4URL=http://www.yageo.com/documents/recent/UPY-GPHC_X5R_4V-to-50V_12.pdf?src-supplier=Avnet+Europe, ComponentLink5Description=https://search.murata.co.jp/Ceramy/image/img/A01X/G101/ENG/GRM033R61C473KE84-01.pdf?src-supplier=Digi-Key, ComponentLink5URL=https://search.murata.co.jp/Ceramy/image/img/A01X/G101/ENG/GRM033R61C473KE84-01.pdf?src-supplier=Digi-Key, ComponentLink6Description=http://www.mouser.com/ds/2/281/c02e-2905.pdf?src-supplier=Mouser, ComponentLink6URL=http://www.mouser.com/ds/2/281/c02e-2905.pdf?src-supplier=Mouser, Height=0.3mm, Lead Free="Lead Free", Length=0.024inch, Manufacturer Part Number=GRM033R61C473KE84D, Mount="Surface Mount", Packaging="Tape and Reel", Pricing 1="1=0.1, 10=0.068, 100=0.0304, 500=0.0217, 1000=0.0171, 2500=0.0155, 5000=0.0143 (USD)", Stock 1=982372, Supplier 1=Digi-Key, Termination=SMD/SMT, Thickness=0.013inch, Voltage Rating (DC)=16V, Weight=1.2E-05oz, Width=0.012inch
C15 C16: library part GRM31CR61E476ME44L, "CAP CER 47UF 25V X5R 1206", Dielectric=X5R, MANUFACTURER=Murata, Supplier Part Number 1=490-16268-1-ND, Tolerance=20%, Voltage Rating (DC)=25V, Capacitance=47uF, Length=3.2mm, Manufacturer Part Number=GRM31CR61E476ME44L, Pricing 1="1=1.03, 10=0.817, 100=0.6127, 500=0.4629, 1000=0.4085 (USD)", Stock 1=387, Supplier 1=Digi-Key, Thickness=1.6mm, Width=1.6mm
C25 CU5: library part CL10A475KA8NQNC, "CAP CER 4.7UF 25V X5R 0603", Capacitance=4.7uF, Case/Package=0603, Case Code (Metric)=1608, Dielectric=X5R, MANUFACTURER=Samsung, Max Operating Temperature=85°C, Min Operating Temperature=-55°C, Package Quantity=1, Supplier Part Number 1=1276-1900-1-ND, Tolerance=10%, Voltage Rating=25V, Case Code (Imperial)=0603, ComponentLink1Description=http://www.samsungsem.com/kr/support/product-search/mlcc/CL10A475KA8NQNC.jsp?src-supplier=Digi-Key, ComponentLink1URL=http://www.samsungsem.com/kr/support/product-search/mlcc/CL10A475KA8NQNC.jsp?src-supplier=Digi-Key, Contact Plating=Tin, Depth=0.8mm, Lead Free="Lead Free", Length=1.6mm, Manufacturer Part Number=CL10A475KA8NQNC, Mount="Surface Mount", Packaging="Tape and Reel", Pricing 1="1=0.37, 10=0.255, 100=0.1528, 500=0.11456, 1000=0.09675 (USD)", Stock 1=2252340, Supplier 1=Digi-Key, Termination=Wraparound, Thickness=0.035inch, Width=0.031inch
C34 C35: library part GCM1555C1H470JA16D, "CAP CER 47PF 50V C0G/NP0 0402", Case/Package=0402, Case Code (Metric)=1005, MANUFACTURER=Murata, Max Operating Temperature=125°C, Min Operating Temperature=-55°C, Ratings=AEC-Q200, Supplier Part Number 1=490-10670-1-ND, Tolerance=5%, Voltage Rating=50V, Capacitance=47pF, Case Code (Imperial)=0402, Lead Free="Lead Free", Length=0.039inch, Manufacturer Part Number 1=GCM1555C1H470JA16D, Mount="Surface Mount", Packaging="Cut Tape", Pricing 1="1=0.1, 10=0.068, 100=0.0303, 500=0.0217, 1000=0.017, 2500=0.0155, 5000=0.0142 (USD)", Stock 1=524245, Supplier 1=Digi-Key, Thickness=0.022inch, Width=0.02inch
CF2 CF3: library part TMK107BBJ106MA-T, "CAP CER 10UF 25V X5R 0603", Case/Package=0603, Case Code (Metric)=1608, MANUFACTURER="Taiyo Yuden", Max Operating Temperature=85°C, Min Operating Temperature=-55°C, Supplier Part Number 1=587-6023-1-ND, Tolerance=20%, Voltage Rating=25V, Capacitance=10uF, Case Code (Imperial)=0603, ComponentLink1Description=http://ds.yuden.co.jp/TYCOMPAS/ut/detail.do?productNo=TMK107BBJ106MA-T&fileName=TMK107BBJ106MA-T_SS&mode=specSheetDownload&src-supplier=Digi-Key, ComponentLink1URL=http://ds.yuden.co.jp/TYCOMPAS/ut/detail.do?productNo=TMK107BBJ106MA-T&fileName=TMK107BBJ106MA-T_SS&mode=specSheetDownload&src-supplier=Digi-Key, Lead Free="Lead Free", Manufacturer Part Number=TMK107BBJ106MA-T, Mount="Surface Mount", Packaging="Tape and Reel", Pricing 1="1=0.51, 10=0.352, 100=0.211, 500=0.15826, 1000=0.13363 (USD)", Stock 1=1368, Supplier 1=Digi-Key
CF6 CF7: library part CC0805MKX5R8BB226, "CAP CER 22UF 25V X5R 0805", Case/Package=0805, Case Code (Metric)=2012, Dielectric=X5R, MANUFACTURER=Yageo, Max Operating Temperature=85°C, Min Operating Temperature=-55°C, Package Quantity=3000, Supplier Part Number 1=311-1903-1-ND, Tolerance=20%, Voltage Rating=25V, Capacitance=22uF, Case Code (Imperial)=0805, ComponentLink1Description=http://www.yageo.com/documents/recent/UPY-GPHC_X5R_4V-to-50V_25.pdf?src-supplier=Digi-Key, ComponentLink1URL=http://www.yageo.com/documents/recent/UPY-GPHC_X5R_4V-to-50V_25.pdf?src-supplier=Digi-Key, ComponentLink2Description=http://www.mouser.com/ds/2/447/Yageo_UPY-GP_NP0_16V-to-50V_9-358835.pdf?src-supplier=Mouser, ComponentLink2URL=http://www.mouser.com/ds/2/447/Yageo_UPY-GP_NP0_16V-to-50V_9-358835.pdf?src-supplier=Mouser, Halogen Free="Halogen Free", Height=1.25mm, Lead Free="Lead Free", Length=0.079inch, Manufacturer Part Number=CC0805MKX5R8BB226, Mount="Surface Mount", Packaging="Tape and Reel", Pricing 1="1=0.52, 10=0.369, 100=0.243, 500=0.17998, 1000=0.15298 (USD)", Stock 1=142930, Supplier 1=Digi-Key, Termination=SMD/SMT, Thickness=0.057inch, Voltage Rating (DC)=25V, Weight=0.000194oz, Width=0.049inch
CU1 CU2 CU3 CU4 CU8: library part CC0402KRX7R7BB104, "CAP CER 0.1UF 16V X7R 0402", Capacitance=100nF, Case/Package=0402, Case Code (Metric)=1005, Dielectric=X7R, MANUFACTURER=Yageo, Max Operating Temperature=125°C, Min Operating Temperature=-55°C, Package Quantity=1, Supplier Part Number 1=311-1338-1-ND, Tolerance=10%, Voltage=16V, Case Code (Imperial)=0402, ComponentLink1Description=http://www.yageo.com/documents/recent/UPY-GPHC_X7R_6.3V-to-50V_8.pdf?src-supplier=Avnet+Europe, ComponentLink1URL=http://www.yageo.com/documents/recent/UPY-GPHC_X7R_6.3V-to-50V_8.pdf?src-supplier=Avnet+Europe, ComponentLink2Description=http://www.yageo.com/documents/recent/UPY-GPHC_X7R_6.3V-to-50V_18.pdf?src-supplier=Digi-Key, ComponentLink2URL=http://www.yageo.com/documents/recent/UPY-GPHC_X7R_6.3V-to-50V_18.pdf?src-supplier=Digi-Key, ComponentLink3Description=http://www.yageo.com/documents/recent/UPY-GPHC_X7R_6.3V-to-50V_8.pdf?src-supplier=Avnet, ComponentLink3URL=http://www.yageo.com/documents/recent/UPY-GPHC_X7R_6.3V-to-50V_8.pdf?src-supplier=Avnet, ComponentLink4Description=http://www.yageo.com/documents/recent/UPY-GPHC_X7R_6.3V-to-50V_18.pdf?src-supplier=Mouser, ComponentLink4URL=http://www.yageo.com/documents/recent/UPY-GPHC_X7R_6.3V-to-50V_18.pdf?src-supplier=Mouser, ComponentLink5Description=http://www.farnell.com/datasheets/2167236.pdf?src-supplier=Element14, ComponentLink5URL=http://www.farnell.com/datasheets/2167236.pdf?src-supplier=Element14, ComponentLink6Description=http://www.farnell.com/datasheets/1489800.pdf?src-supplier=Element14, ComponentLink6URL=http://www.farnell.com/datasheets/1489800.pdf?src-supplier=Element14, Composition=Ceramic, Depth=0.5mm, Halogen Free="Halogen Free", Height=0.5mm, Lead Free="Lead Free", Length=1mm, Manufacturer Part Number=CC0402KRX7R7BB104, Mount="Surface Mount", Number of Pins=2, Packaging="Tape and Reel", Pricing 1="1=0.1, 10=0.034, 100=0.015, 500=0.0107, 1000=0.00841, 2500=0.00764, 5000=0.00703 (USD)", Radiation Hardening=No, REACH SVHC="No SVHC", Stock 1=16982736, Supplier 1=Digi-Key, Termination=SMD/SMT, Thickness=0.022inch, Voltage Rating=16V, Voltage Rating (DC)=16V, Width=0.02inch
CU6: library part GRM155R61E105KA12D, "CAP CER 1UF 25V X5R 0402", Case/Package=0402, Case Code (Metric)=1005, Dielectric=X5R, MANUFACTURER=Murata, Max Operating Temperature=85°C, Min Operating Temperature=-55°C, Package Quantity=10000, Supplier Part Number 1=490-10017-1-ND, Tolerance=10%, Voltage=25V, Capacitance=1uF, Case Code (Imperial)=0402, ComponentLink1Description=http://www.farnell.com/datasheets/2048341.pdf?src-supplier=Element14, ComponentLink1URL=http://www.farnell.com/datasheets/2048341.pdf?src-supplier=Element14, Depth=0.5mm, Height=0.5mm, Lead Free="Lead Free", Length=1mm, Manufacturer Part Number=GRM155R61E105KA12D, Material=Ceramic, Mount="Surface Mount", Packaging="Tape and Reel", Pricing 1="1=0.11, 10=0.077, 100=0.0363, 500=0.02546, 1000=0.02108, 2500=0.01962, 5000=0.01795 (USD)", REACH SVHC="No SVHC", Stock 1=1194305, Supplier 1=Digi-Key, Termination=SMD/SMT, Thickness=0.022inch, Voltage Rating=25V, Voltage Rating (DC)=25V, Weight=0.000212oz, Width=0.5mm
CU7: library part CC0402KRX7R8BB103, "CAP CER 10000PF 25V X7R 0402", Case/Package=0402, Case Code (Metric)=1005, Dielectric=X7R, MANUFACTURER=Yageo, Max Operating Temperature=125°C, Min Operating Temperature=-55°C, Package Quantity=1, Supplier Part Number 1=311-1337-1-ND, Tolerance=10%, Voltage Rating=25V, Capacitance=10nF, Case Code (Imperial)=0402, ComponentLink1Description=http://www.yageo.com/documents/recent/UPY-GPHC_X7R_6.3V-to-50V_18.pdf?src-supplier=Digi-Key, ComponentLink1URL=http://www.yageo.com/documents/recent/UPY-GPHC_X7R_6.3V-to-50V_18.pdf?src-supplier=Digi-Key, ComponentLink2Description=https://www.verical.com/server-webapp/html/getDatasheet?partID=375418&src-supplier=Verical, ComponentLink2URL=https://www.verical.com/server-webapp/html/getDatasheet?partID=375418&src-supplier=Verical, ComponentLink3Description=http://www.yageo.com/documents/recent/UPY-GPHC_X7R_6.3V-to-50V_8.pdf?src-supplier=Avnet, ComponentLink3URL=http://www.yageo.com/documents/recent/UPY-GPHC_X7R_6.3V-to-50V_8.pdf?src-supplier=Avnet, ComponentLink4Description=https://4donline.ihs.com/images/VipMasterIC/IC/YAGO/YAGO-S-A0003557223/YAGO-S-A0003557223-1.pdf?hkey=52A5661711E402568146F3353EA87419&src-supplier=Element14, ComponentLink4URL=https://4donline.ihs.com/images/VipMasterIC/IC/YAGO/YAGO-S-A0003557223/YAGO-S-A0003557223-1.pdf?hkey=52A5661711E402568146F3353EA87419&src-supplier=Element14, ComponentLink5Description=http://www.farnell.com/datasheets/2167236.pdf?src-supplier=Element14, ComponentLink5URL=http://www.farnell.com/datasheets/2167236.pdf?src-supplier=Element14, ComponentLink6Description=http://www.mouser.com/ds/2/447/Yageo_UPY-GP_NP0_16V-to-50V_9-358835.pdf?src-supplier=Mouser, ComponentLink6URL=http://www.mouser.com/ds/2/447/Yageo_UPY-GP_NP0_16V-to-50V_9-358835.pdf?src-supplier=Mouser, Composition=Ceramic, Depth=0.5mm, Halogen Free="Halogen Free", Height=0.5mm, Lead Free="Lead Free", Length=1mm, Manufacturer Part Number=CC0402KRX7R8BB103, Mount="Surface Mount", Packaging="Tape and Reel", Pricing 1="1=0.1, 10=0.021, 100=0.0093, 500=0.00666, 1000=0.00523, 2500=0.00476, 5000=0.00438 (USD)", Radiation Hardening=No, REACH SVHC=Unknown, Stock 1=0, Supplier 1=Digi-Key, Termination=SMD/SMT, Thickness=0.022inch, Voltage Rating (DC)=25V, Width=0.02inch
CU9 CU10: library part GJM0336C1E200JB01D, "CAP CER 20PF 25V C0H 0201", Case/Package=0201, Case Code (Metric)=0603, MANUFACTURER=Murata, Max Operating Temperature=125°C, Min Operating Temperature=-55°C, Supplier Part Number 1=490-13313-1-ND, Tolerance=5%, Voltage Rating=25V, Capacitance=20pF, Case Code (Imperial)=0201, ComponentLink1Description=http://www.mouser.com/ds/2/281/c02e-2905.pdf?src-supplier=Mouser, ComponentLink1URL=http://www.mouser.com/ds/2/281/c02e-2905.pdf?src-supplier=Mouser, ComponentLink2Description=http://search.murata.co.jp/Ceramy/image/img/A01X/partnumbering_e_01.pdf?src-supplier=Digi-Key, ComponentLink2URL=http://search.murata.co.jp/Ceramy/image/img/A01X/partnumbering_e_01.pdf?src-supplier=Digi-Key, Lead Free="Lead Free", Length=0.024inch, Manufacturer Part Number=GJM0336C1E200JB01D, Mount="Surface Mount", Packaging="Tape and Reel", Pricing 1="1=0.1, 10=0.074, 100=0.0329, 500=0.02348, 1000=0.01845, 2500=0.01678, 5000=0.01543 (USD)", Stock 1=13650, Supplier 1=Digi-Key, Termination=SMD/SMT, Thickness=0.013inch, Voltage Rating (DC)=25V, Width=0.012inch
D1 D2: "DIODE SCHOTTKY 30V 1A SOD123W", MANUFACTURER=Nexperia, Supplier Part Number 1=1727-5201-1-ND, Manufacturer Part Number=PMEG3010ER,115, Pricing 1="1=0.36, 10=0.29, 100=0.1669, 500=0.1545, 1000=0.10506 (USD)", Stock 1=75070, Supplier 1=Digi-Key
F1: "PTC RESET FUSE 16V 2.5A 1812", Case/Package=1812, Case Code (Metric)=4532, Current Rating=100A, Hold Current=2.5A, MANUFACTURER=Bourns, Max Operating Temperature=85°C, Min Operating Temperature=-40°C, Package Quantity=1500, Power Dissipation=1.2W, Resistance=100mR, Supplier Part Number 1=MF-MSMF250/16X-2DKR-ND, Trip Current=5A, Voltage Rating=16V, Approvals=UL,CSA,TUV, Case Code (Imperial)=1812, ComponentLink1Description=http://www.bourns.com/data/global/PDFs/MFMSMF.pdf?src-supplier=Avnet, ComponentLink1URL=http://www.bourns.com/data/global/PDFs/MFMSMF.pdf?src-supplier=Avnet, ComponentLink2Description=http://www.onlinecomponents.com/productFiles/mf-BO/mfmsmf.pdf?src-supplier=Onlinecomponents.com, ComponentLink2URL=http://www.onlinecomponents.com/productFiles/mf-BO/mfmsmf.pdf?src-supplier=Onlinecomponents.com, ComponentLink3Description=http://www.bourns.com/docs/Product-Datasheets/mfmsmf.pdf?src-supplier=Digi-Key, ComponentLink3URL=http://www.bourns.com/docs/Product-Datasheets/mfmsmf.pdf?src-supplier=Digi-Key, ComponentLink4Description=https://www.distrelec.biz/Web/Downloads/_t/ds/MF-MSMF-series_eng_tds.pdf?mime=application%2Fpdf&src-supplier=Distrelec, ComponentLink4URL=https://www.distrelec.biz/Web/Downloads/_t/ds/MF-MSMF-series_eng_tds.pdf?mime=application%2Fpdf&src-supplier=Distrelec, ComponentLink5Description=https://www.bourns.com/docs/Product-Datasheets/mfmsmf.pdf?src-supplier=Digi-Key, ComponentLink5URL=https://www.bourns.com/docs/Product-Datasheets/mfmsmf.pdf?src-supplier=Digi-Key, ComponentLink6Description=http://www.bourns.com/data/global/PDFs/MFMSMF.pdf?src-supplier=Avnet+Europe, ComponentLink6URL=http://www.bourns.com/data/global/PDFs/MFMSMF.pdf?src-supplier=Avnet+Europe, ComponentLink7Description=https://www.alliedelec.com/m/d/cf35a02888a9c5f02c699b5f7c4f475e.pdf?src-supplier=Allied+Electronics, ComponentLink7URL=https://www.alliedelec.com/m/d/cf35a02888a9c5f02c699b5f7c4f475e.pdf?src-supplier=Allied+Electronics, ComponentLink8Description=http://www.farnell.com/datasheets/2038616.pdf?src-supplier=Element14, ComponentLink8URL=http://www.farnell.com/datasheets/2038616.pdf?src-supplier=Element14, ComponentLink9Description=http://www.produktinfo.conrad.com/datenblaetter/1000000-1099999/001055646-da-01-en-SICH_PTC_RESET_MF_MSMF250_16X_2__2_5A16V.pdf?src-supplier=Conrad, ComponentLink9URL=http://www.produktinfo.conrad.com/datenblaetter/1000000-1099999/001055646-da-01-en-SICH_PTC_RESET_MF_MSMF250_16X_2__2_5A16V.pdf?src-supplier=Conrad, Contact Plating=Gold, Height=1.6mm, Length=4.73mm, Manufacturer Part Number=MF-MSMF250/16X-2, Max Current Rating=100A, Mount="Surface Mount,PCB", Number of Terminals=2, Packaging="Tape and Reel", Pricing 1="1=0.76, 5=0.742, 10=0.719, 50=0.6048, 100=0.5022, 250=0.45652, 500=0.38802 (USD)", Radiation Hardening=No, REACH SVHC="No SVHC", Stock 1=30065, Supplier 1=Digi-Key, Termination=SMD/SMT, Time to Trip=5s, Voltage Rating (DC)=16V, Width=3.41mm
FB1: "FERRITE BEAD 120 OHM 0402 1LN", Case/Package=0402, Case Code (Metric)=1005, Current Rating=200mA, DC Resistance (DCR)=1.5R, MANUFACTURER=TDK, Package Quantity=10000, Supplier Part Number 1=445-6795-6-ND, Tolerance=25%, Case Code (Imperial)=0402, ComponentLink1Description=http://product.tdk.com/en/catalog/datasheets/beads_commercial_signal_mmz-e_en.pdf?src-supplier=Avnet, ComponentLink1URL=http://product.tdk.com/en/catalog/datasheets/beads_commercial_signal_mmz-e_en.pdf?src-supplier=Avnet, ComponentLink2Description=https://media.digikey.com/pdf/Data%20Sheets/TDK%20PDFs/MMZ-E_Series_Br.pdf?src-supplier=Digi-Key, ComponentLink2URL=https://media.digikey.com/pdf/Data%20Sheets/TDK%20PDFs/MMZ-E_Series_Br.pdf?src-supplier=Digi-Key, ComponentLink3Description=http://product.tdk.com/emc/beads/en/documents/beads_commercial_signal_mmz-e_en.pdf?src-supplier=Digi-Key, ComponentLink3URL=http://product.tdk.com/emc/beads/en/documents/beads_commercial_signal_mmz-e_en.pdf?src-supplier=Digi-Key, Core Material=Ferrite, Height=0.022inch, Impedance=120R, Length=0.039inch, Manufacturer Part Number=MMZ1005F121ET000, Max DC Current=200mA, Mount="Surface Mount", Packaging="Cut Tape", Pricing 1="1=0.21, 10=0.173, 25=0.1348, 50=0.1116, 100=0.0963, 250=0.077, 500=0.0693, 1000=0.05775, 5000=0.0539 (USD)", Stock 1=29972, Supplier 1=Digi-Key, Width=0.02inch
J6: library part "Terminal Block 12 Pin", "TERM BLK 12P SIDE ENT 5.08MM PCB", Color=Green, Current=10A, Current Rating=13.5A, Flammability Rating="UL94 V-0", MANUFACTURER="Phoenix Contact", Max Supply Voltage=250V, Package Quantity=50, Supplier Part Number 1=277-1257-ND, Voltage=300V, Voltage Rating=400V, Approvals=UL,CSA,cULus,CB, ComponentLink1Description=https://media.digikey.com/pdf/Data%20Sheets/Phoenix%20Contact%20PDFs/1729225.pdf?src-supplier=Digi-Key, ComponentLink1URL=https://media.digikey.com/pdf/Data%20Sheets/Phoenix%20Contact%20PDFs/1729225.pdf?src-supplier=Digi-Key, Connector Type=Screw, Contact Material=Tin, Depth=8.1mm, Height=13.5mm, Housing Color=Green, Housing Material=Polyamide, Insulation Material=Nylon, Lead Free="Lead Free", Length=60.96mm, Manufacturer Part Number=1729225, Max Current Rating=13.5A, Mount="Through Hole", Number of Circuits=12, Number of Contacts=12, Number of Levels=1, Number of Pins=12, Number of Poles=12, Number of Positions=12, Number of Positions Per Level=12, Number of Rows=1, Orientation=Straight, Packaging=Bulk, Pitch=5.08mm, Pricing 1="1=6.06, 10=5.898, 50=5.5126, 100=5.0715, 250=4.68564, 500=4.46518, 1000=4.18954 (USD)", Stock 1=916, Stripping Length=6mm, Supplier 1=Digi-Key, Termination=Screw, Weight=1oz, Width=60.96mm, Wire Gauge (Max)=30AWG, Wire Gauge (Min)=14AWG
L1: "2.2uH ±20% 5.5A 29mΩ SMD,5.75x5.2x3mm Inductors (SMD) RoHS", MANUFACTURER=COILMX, Package=Custom, Manufacturer Part No=MS0530-2R2M
LED1: "LED GREEN CLEAR CHIP 0603 SMD", Case/Package=0603, Case Code (Metric)=1608, Color=Green, Forward Current=30mA, Forward Voltage=2V, Lens Color=Colorless, MANUFACTURER="Vishay Lite-On", Max Operating Temperature=85°C, Min Operating Temperature=-55°C, Package Quantity=1, Power Dissipation=75mW, Reverse Voltage=5V, Supplier Part Number 1=160-1435-6-ND, Test Current=20mA, Case Code (Imperial)=0603, ComponentLink1Description=https://www.verical.com/server-webapp/html/getDatasheet?partID=141494&src-supplier=Verical, ComponentLink1URL=https://www.verical.com/server-webapp/html/getDatasheet?partID=141494&src-supplier=Verical, ComponentLink2Description=http://optoelectronics.liteon.com/upload/download/DS22-2000-074/LTST-C190KGKT.PDF?src-supplier=Digi-Key, ComponentLink2URL=http://optoelectronics.liteon.com/upload/download/DS22-2000-074/LTST-C190KGKT.PDF?src-supplier=Digi-Key, ComponentLink3Description=http://www.mouser.com/ds/2/239/LTST-C190KGKT-1141861.pdf?src-supplier=Mouser, ComponentLink3URL=http://www.mouser.com/ds/2/239/LTST-C190KGKT-1141861.pdf?src-supplier=Mouser, ComponentLink4Description=http://uk.rs-online.com/webdocs/0dc0/0900766b80dc02a8.pdf?src-supplier=RSComponents, ComponentLink4URL=http://uk.rs-online.com/webdocs/0dc0/0900766b80dc02a8.pdf?src-supplier=RSComponents, Depth=0.8mm, Dominant Wavelength=571nm, Height=0.8mm, Illumination Color=Green, Lead Free="Lead Free", Length=1.6mm, Lens Style=Diffused,Colorless,Rectangular,Clear, Lens Transparency=Clear, Luminous Intensity=35mcd, Manufacturer Part Number=LTST-C190KGKT, Mount="Surface Mount", Number of Elements=1, Number of LEDs=1, Number of Pins=2, Packaging="Tape and Reel", Power Rating=75mW, Pricing 1="1=0.26, 10=0.188, 25=0.138, 100=0.0987, 250=0.06712, 500=0.05922, 1000=0.04639 (USD)", Radiation Hardening=No, Stock 1=1327387, Supplier 1=Digi-Key, Viewing Angle=130°, Wavelength=574nm, Width=0.8mm